# Altium PCB ArmBand-Control-Board.PcbDoc (part 3 of 3)
Units mil, origin at the board's own origin, x right, y up, seen from the top; angles counter-clockwise.
Board outline 1771.65 x 1771.65 mil, 2 copper layers (Top Layer, Bottom Layer), stack 34 mil thick; 107 components, 81 nets, 408 pads, 170 vias.
Unrouted connection lines stored in the file: 5.
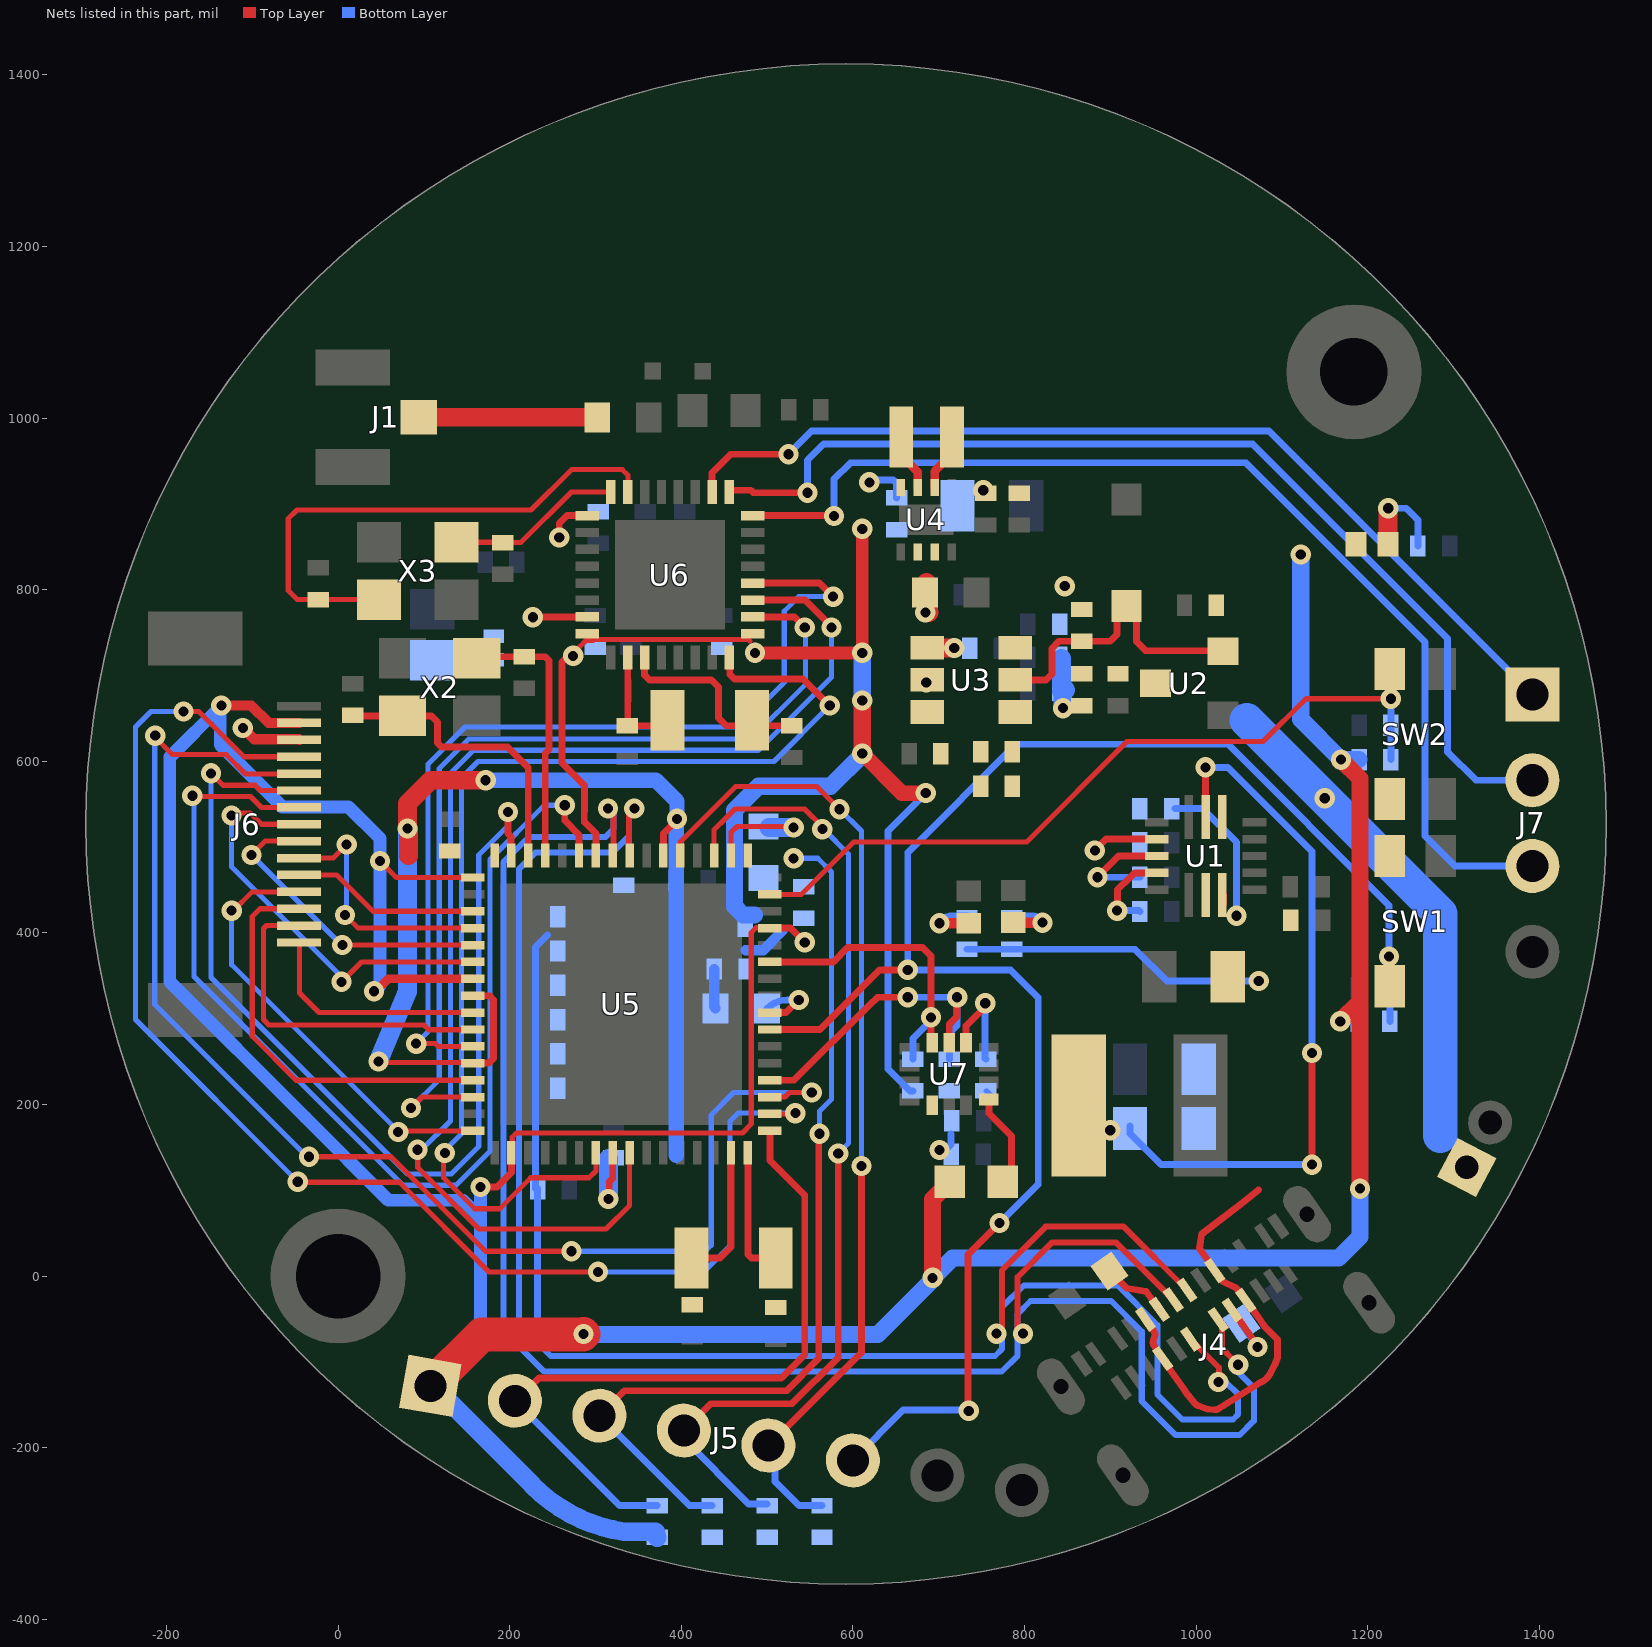
[diagram p2: the nets of this part, all layers, seen from the top]

## Via types
v1: diameter 23.62, hole 11.81, Top Layer to Bottom Layer, tented both sides, 169 vias
v2: diameter 17.72, hole 11.81, Top Layer to Bottom Layer, tented both sides, 1 vias

## Nets (pads, with @x,y where several pads share a name; then routed paths per layer and width w, separated by ;. In a path a pad name is that pad's centre, name@x,y a point inside that pad or via, vN(x,y) a via of type N, cw(c..) or ccw(c..) an arc to the next point about the centre after c; other vN are vias at no path point) (continued)
NetC16_2: C16.2 U1.14 | length 128.7
  Top Layer w8: v1(885,465) 909.69,489.68 U1.14@954,489.68
  Bottom Layer w8: v1(885,465) C16.2@934.5,465
NetC22_2: C22.2 U1.15 | length 105.1
  Top Layer w8: v1(908,426) 908.6,426.6 908.6,450.38 922.3,464.08 928.22,470 U1.15@954,470
  Bottom Layer w8: v1(908,426) 933.5,426 C22.2@934.5,425
NetC44_1: C44.1 R27.2 U3.6
NetJ1_1: J1.1 SB3.2 | length 208
  Top Layer w22: J1.1@94,1001 SB3.2@302,1001
NetJ4_A5: J4.A5 R20.2 | length 77.4
  Top Layer w8: R20.2@899,6 919,-14 942,-18 J4.A5@957.23,-38.75
NetJ4_B5: J4.B5 R21.2 | length 81.2
  Top Layer w8: J4.B5@1043.9,-41.54 1050.07,-50.36 1067.23,-74.86 v1@1070.9,-81.13
  Bottom Layer w8: R21.2@1053,-55 v1(1071.56,-82.56)
NetL1_1: L1.1 U4.7 | length 88
  Top Layer w10: L1.1@654,998 657.58,994.42 657.58,955.42 675.69,937.32 U4.7@675.69,919
NetL3_1: L3.1 L4.1
NetL4_2: L4.2 U6.31 | length 63.3
  Top Layer w8: v1@227,768.33 U6.31@290.33,768.33
  other v1: 227,768
NetL6_2: L6.2 U7.8 | length 111.3
  Top Layer w8: U7.8@758.52,206 758.52,189.5 763.21,184.81 763.45,184.81 785,163.26 785,120.09 L6.2@774.91,110
NetLED1_2: LED1.2 R28.2 | length 112.9
  Top Layer w22: LED1.2@1223.7,853 1223.7,895 v1(1224,895)
  Bottom Layer w8: v1(1224,895) 1245,895 1258.5,881.5 R28.2@1258.5,851
NetLED2_1: LED2.1 R2.1 | length 67.8
  Top Layer w12: v1(701,411.3) LED2.1@735,411.3
  Bottom Layer w12: v1(701,411.3) cw(c717.18,395.12) 717.18,418 R2.1@733,418
NetLED3_1: LED3.1 R3.1 | length 71.6
  Top Layer w12: LED3.1@787,412 v1(821,412)
  Bottom Layer w12: R3.1@785,418 806.51,418 cw(c806.51,397.51) v1(821,412)
NetR5_2: R5.2 SB1.2 | length 46.4
  Bottom Layer w12: R5.2@438.5,358 438.5,315.62 ccw(c443.62,315.62) SB1.2@440,312
NetR6_2: R6.2 SB2.2
NetR9_1: R9.1 U3.1 | length 31
  Top Layer w22: U3.1@687.22,732 v1(718.19,732)
NetR12_2: R12.2 U7.12 | length 120.7
  Top Layer w8: U7.12@731.94,271.94 731.94,291.85 754.31,314.21 v1(754.31,318.01)
  Bottom Layer w8: v1(754.31,318.01) 754.19,317.89 754.19,253.81 R12.2@755,253
NetR26_1: R26.1 U4.8 | length 51.5
  Bottom Layer w8: v1(619.2,925.19) 621.88,927.87 647.13,927.87 651,924 R26.1@651,907
NetSB1_1: SB1.1 U5.40 | length 78.2
  Top Layer w8: U5.40@504.61,307.15 522.15,307.15 v1(537,322)
  Bottom Layer w8: SB1.1@500,312 cw(c524.14,287.86) 524.14,322 v1(537,322)
NetSB2_1: SB2.1 U5.50 | length 132.5
  Top Layer w6: U5.50@457.95,490.23 457.95,517.31 464.83,524.19 529.58,524.19 v1(530.96,522.81)
  Bottom Layer w22: SB2.1@502.12,523.12 530.65,523.12 v1(530.96,522.81)
NRST: C24.1 J5.6 R8.1 SW1.1 U5.39 | length 1993.9
  Top Layer w8: U5.39@503.23,287.47 561.47,287.47 631,357 v1(664,357) ; v1(735,-157) 734.09,-156.09 734.09,25.09 v1(771,62)
  Bottom Layer w8: J5.6@599.96,-214.73 658.65,-156.04 734.04,-156.04 v1(735,-157) ; v1(771,62) 816,107 816,325 784,357 v1(664,357) 664,494 790,620 1037,620 1224.89,432.11 v1(1224.89,372.57) ; R8.1@1226,297 C24.1@1226,336 v1@1226,372.57
NTC: R18.1 R19.1 U1.13 | length 77.7
  Top Layer w8: v1(882,496) 882,496.24 895.13,509.37 U1.13@954,509.37
PWR_RST: D1.2 R4.2 R22.1 U2.2 U3.5 | length 348
  Top Layer w8: U3.5@789.18,695 825,695 832,702 832,731.61 840.39,740 900.05,740 907.96,747.91 907.96,770.36 D1.2@918.88,781.28 930.37,769.79 930.37,739.59 940.96,729 1030.77,729 U2.2@1031.37,728.4
RS1: L8.2 R1.2 U1.10 | length 858.3
  Top Layer w8: L8.2@866.13,172 898,172 v1(900,170) ; v1(1011,593) 1011.09,592.91 U1.10@1011.09,534.96 ; v1(1135,130) v1(1135,260)
  Bottom Layer w8: R1.2@923,175 923,166 959,130 v1(1135,130) ; v1(1011,593) 1037,593 1135,495 v1(1135,260)
RST_NRF: J7.3 U6.16 | length 1287
  Top Layer w8: U6.16@483.25,886.44 577.56,886.44 v1(578,886)
  Bottom Layer w8: v1(578,886) 578,929 597,948 1058.3,948 1267,739.3 1267,513 1302,478 J7.3@1392,478
RXD0: J6.11 U5.35 | length 1602.4
  Top Layer w6: v1(-213,630) -213,628 -192.81,607.81 -130.4,607.81 -107.76,585.17 -89.64,585.17 -45.56,585.17 J6.11@-45,585.73 ; v1(-34,139.14) 61.86,139.14 172,29 v1(272,29) ; U5.35@503.23,208.73 520.89,208.73 526.16,214.01 v1(552.01,214.01)
  Bottom Layer w6: v1(-213,630) -213.62,629.38 -213.62,316.62 v1@-35.07,138.07 ; v1(272,29) 428,29 435,36 435,188 461.01,214.01 v1(552.01,214.01)
SCL: R10.1 U5.36 U7.13 | length 386.7
  Top Layer w8: U5.36@504.61,228.42 531.68,228.42 619.46,316.2 619.66,316 628.68,325.01 v1@663.81,325.01 ; U7.13@712.26,271.94 712.26,293.38 714.06,295.17 721.51,302.62 v1@721.51,322.01
  Bottom Layer w8: v1@663.81,325.01 v1(721.51,325.01) 721.51,292.2 712.63,283.33 712.63,253.13 R10.1@712.5,253
  other v1: 664,325.01
SDA: R11.1 U5.43 U7.14 | length 357.9
  Top Layer w8: U5.43@503.23,366.21 577.21,366.21 594,383 681,383 691.01,372.99 v1(691.01,301.67) 691.01,273.51 U7.14@692.57,271.94
  Bottom Layer w8: R11.1@670,253 670,277.16 691.01,298.17 v1(691.01,301.67)
SENSOR1: J6.1 U5.9 | length 268.7
  Top Layer w6: J6.1@-45,388.88 -45,330 -22.16,307.16 U5.9@155.39,307.16
SENSOR2: J6.2 U5.10 | length 397.9
  Top Layer w6: J6.2@-45,408.57 -83.49,408.57 -87,405.06 -87,299 -80.81,292.81 100.03,292.81 105.68,287.17 U5.10@156.47,287.17
SENSOR3: J6.3 U5.13 | length 476.3
  Top Layer w6: J6.3@-45,428.25 -90.88,428.25 -100,419.12 -100,279.5 -48.92,228.42 82.42,228.42 U5.13@156.77,228.42
SENSOR4: J6.4 U5.16 | length 514.6
  Top Layer w6: v1(-124,426) -123,425 -100.06,447.94 J6.4@-45,447.94 ; v1(70,168) 71.36,169.36 U5.16@156.77,169.36
  Bottom Layer w6: v1(-124,426) -124,363 69,170 70,169 v1(70,168)
SENSOR5: J6.5 U5.3 | length 219.3
  Top Layer w6: J6.5@-45,467.62 -1.62,467.62 40.73,425.27 U5.3@156.77,425.27
SENSOR6: J6.6 U5.4 | length 299.5
  Top Layer w6: J6.6@-45,487.31 -5.69,487.31 v1(10,503) ; v1(8,421) 23.42,405.58 U5.4@156.77,405.58
  Bottom Layer w6: v1(8,421) 10,423 v1(10,503)
SENSOR7: J6.7 U5.5 | length 363.9
  Top Layer w6: v1(-101,491) -85,507 J6.7@-45,507 ; v1(5,386) 5.1,385.9 U5.5@156.77,385.9
  Bottom Layer w6: v1(-101,491) 4,386 v1(5,386)
SENSOR8: J6.8 U5.6 | length 495.3
  Top Layer w6: v1(-124.17,537) -121.34,539.83 -102.44,539.83 -89.3,526.68 J6.8@-45,526.68 ; v1(4,343) 27.21,366.21 78.79,366.21 U5.6@156.77,366.21
  Bottom Layer w6: v1(-124.17,537) -124.17,477.17 4,349 v1(4,343)
SW1: J6.9 U5.59 | length 1323.8
  Top Layer w6: v1(-169.81,560) -169.81,559.17 -101.94,559.17 -89.14,546.37 J6.9@-45,546.37
  Top Layer w8: v1(264.23,548.8) 264.23,530.86 280.79,514.3 U5.59@280.79,490.23
  Bottom Layer w6: v1(-169.81,560) -168.79,558.98 -167.79,558.98 -167.79,349.41 75.62,106 137.38,106 177,145.62 177,485.62 240.19,548.8 v1(264.23,548.8)
SW2: J6.10 U5.63 | length 1225.9
  Top Layer w6: v1(-148,586) -134.17,572.17 -96.55,572.17 -90.43,566.05 J6.10@-45,566.05
  Top Layer w8: v1(198,541) 198,516 201.57,512.43 201.57,490.7 U5.63@202.05,490.23
  Bottom Layer w6: v1(-148,586) -148,348 81,119 132,119 164,151 164,491 198,525 v1(198,541)
SWDCLK: J7.2 U6.17 | length 1224.2
  Top Layer w8: U6.17@455.69,914 455.69,914.49 457.2,916 481,916 484,913 v1(547,913)
  Bottom Layer w8: v1(547,913) 547,951 566,970 1066,970 1293,743 1293,611 1326,578 J7.2@1392,578
SWDIO: J7.1 U6.18 | length 1125.6
  Top Layer w8: U6.18@436,914 436,936.19 457.81,958 v1(525,958)
  Bottom Layer w8: v1(525,958) 552,985 1085,985 J7.1@1392,678
TCK: J5.5 R16.1 U5.53 | length 1138.3
  Top Layer w6: U5.53@398.85,499.04 399.33,499.52 399.33,506.48 406.66,513.81 463.47,570.62 558.02,570.62 v1(584.48,544.16)
  Top Layer w8: J5.5@501.48,-197.36 609.96,-88.88 v1(609.96,128.48)
  Bottom Layer w6: v1(584.48,544.16) 609.96,518.68 v1@609.96,129.04
  Bottom Layer w8: J5.5@501.48,-197.36 509.18,-205.06 509.18,-239.18 537.5,-267.5 R16.1@564,-267.5
TDI: J5.2 R13.1 U5.33 | length 854.4
  Top Layer w8: J5.2@206.04,-145.27 207.63,-145.27 234.28,-118.62 516.58,-118.62 544,-91.21 544,94 503.23,134.77 U5.33@503.23,169.36
  Bottom Layer w8: J5.2@206.04,-145.27 328.27,-267.5 R13.1@372,-267.5
TDO: J5.3 R14.1 U5.49 | length 1080.2
  Top Layer w8: J5.3@304.52,-162.64 333.53,-133.62 522.8,-133.62 560.19,-96.23 560.19,116.6 560.19,165.19 v1(561,166)
  Bottom Layer w6: v1@534.37,490.37 537.74,487 559.14,487 575,471.14 575,435.86 575,337.86 575,206.16 561,192.16 v1(561,166)
  Bottom Layer w8: J5.3@304.52,-162.64 409.38,-267.5 R14.1@436,-267.5
  other v1: 531,487
TMS: J5.4 R15.1 U5.51 | length 1165.3
  Top Layer w6: U5.51@438.27,490.23 438.27,520.27 452,534 462.62,544.62 543.57,544.62 564.45,523.75 v1(564.45,521.01)
  Top Layer w8: J5.4@403,-180 434.38,-148.62 529.01,-148.62 583,-94.63 v1(583,143)
  Bottom Layer w6: v1(564.45,521.01) 565.65,521.01 595,491.66 595,155 v1(583,143)
  Bottom Layer w8: J5.4@403,-180 403,-190 478.5,-265.5 R15.1@500,-265.5
TXD0: J6.12 U5.34 | length 1643.8
  Top Layer w6: v1(-180.1,658.1) -162.31,658.1 -132.99,628.79 -109.62,605.42 J6.12@-45,605.42 ; v1(-47,110) -46.5,109.5 71.5,109.5 176,5 v1(303,5) ; U5.34@503.23,189.05 532.05,189.05 v1(533,190)
  Bottom Layer w6: v1(-180.1,658.1) -217.9,658.1 -236,640 -236,299 v1(-47,110) ; v1(303,5) 426,5 457,36 457,181 466,190 v1(533,190)
UART_CTS: U5.25 U6.11 | length 1481.9
  Top Layer w6: v1(92.54,147.27) 92.85,146.97 92.85,126.54 164.38,55 312.44,55 339.84,82.4 U5.25@339.84,143.77
  Top Layer w8: U6.11@483.25,788.01 544.25,788.01 575,757.26 v1(575,756)
  Bottom Layer w6: v1(92.54,147.27) 97.27,147.27 131,181 131,586.23 157.77,613 490,613 575,698 v1(575,756)
UART_RTS: U5.23 U6.8 | length 1322.1
  Top Layer w6: v1(124.42,143.58) 123,142.15 123,114.77 159.23,78.54 188.54,78.54 224.62,114.62 292.62,114.62 300.47,122.47 U5.23@300.47,143.77
  Top Layer w8: U6.8@455.69,721.08 456.44,720.33 456.44,701.56 462,696 542,696 v1(573,665)
  Bottom Layer w6: v1(124.42,143.58) 124.42,146.42 144,166 144,580.85 163.15,600 508,600 v1(573,665)
UART_RXD: U5.11 U6.12 | length 1099.2
  Top Layer w6: v1(91,271) 113.49,271 116.7,267.79 U5.11@155.39,267.79
  Top Layer w8: U6.12@483.25,807.7 561.3,807.7 v1(577,792)
  Bottom Layer w6: v1(91,271) 105,285 105,597 148,640 468,640 520,692 520,775 537,792 v1(577,792)
UART_TXD: U5.14 U6.10 | length 1085.3
  Top Layer w6: v1(85,196) 97.73,208.73 U5.14@156.77,208.73
  Top Layer w8: U6.10@484.29,768.33 484.45,768.16 531.84,768.16 v1(544,756)
  Bottom Layer w6: v1(85,196) 118,229 118,591.61 152.39,626 481,626 545,690 545,755 v1(544,756)
USB_D_N: J4.A7 J4.B7 U5.56 | length 2265.8
  Top Layer w7: U5.56@339.84,490.23 339.15,490.92 339.15,538.84 v1(345.31,545) ; v1(767.54,-67) 773.7,-60.84 773.7,6.58 824.78,57.66 915.66,57.66 J4.A7@989.48,-16.17 ; J4.B7@993.52,-73.41 1026.73,-106.62 1026.73,-112.54 1030.7,-116.52 1030.7,-119.3 1026.57,-123.43 v1(1025.96,-123.43)
  Bottom Layer w7: v1(345.31,545) 339.15,538.84 339.15,513.42 319.43,493.7 230.06,493.7 211,474.64 211,124 211,-56 248,-93 401.73,-93 765.7,-93 773.7,-85 773.7,-73.16 v1(767.54,-67) 773.7,-60.84 773.7,-36.42 799.42,-10.7 908.58,-10.7 955,-57.12 955,-138 984,-167 1043,-167 1049,-161 1049,-137.81 1034.62,-123.43 v1(1025.96,-123.43)
USB_D_P: J4.A6 J4.B6 U5.57 | length 2292.3
  Top Layer w7: v1(314.69,545) 320.85,538.84 320.85,490.92 U5.57@320.16,490.23 ; v1(798.16,-67) 792,-60.84 792,-1 832.36,39.36 906.54,39.36 J4.A6@973.36,-27.46 ; J4.B6@1025.77,-50.83 1030.49,-55.55 1030.49,-84.51 1043.64,-97.65 1052.35,-97.65 1052.35,-99.99 v1(1049.04,-103.3)
  Bottom Layer w7: v1(314.69,545) 320.85,538.84 320.85,521 311.85,512 222.48,512 192.7,482.22 192.7,116.42 192.7,-63.58 240.42,-111.3 377.56,-111.3 773.28,-111.3 792,-92.58 792,-73.16 v1(798.16,-67) 792,-60.84 792,-44 807,-29 901,-29 936.7,-64.7 936.7,-145.58 976.42,-185.3 1050.58,-185.3 1067.3,-168.58 1067.3,-130.23 1049.04,-111.97 v1(1049.04,-103.3)
VBAT: C2.1 C3.1 C4.1 C43.1 C44.2 J3.1 J6.13 R1.1 R22.2 R24.2 R27.1 U1.9 U3.4 | length 712.5
  Top Layer w12: v1(-111,639) -97.79,625.79 -45.69,625.79 J6.13@-45,625.1
  Top Layer w22: U3.4@789.18,657.6 U3.4@791.96,654.82
  Bottom Layer w22: C43.1@843,681.5 844.69,679.81 844.69,662.31 v1(845,662) ; C4.1@843,720 843,688.31 C43.1@848,683.31
  Bottom Layer w40: 1059,648 v1(1150,557) 1284.62,422.38 1284.62,163.73
  other v1: 846.94,804.23
VBAT#: C5.1 C6.1 C51.1 U3.2 U3.3 U4.2 U4.3 | length 37.4
  Top Layer w22: C5.1@685,792 C5.1@686,792 ; C5.1@686,808.5 C5.1@686,792 ; v1@688.52,773.44 688.21,773.75 688.21,790.29 686.5,792 C5.1@686,792
  other v1: 685.5,692 684.52,773.44
VBAT##: R24.1 R25.1 U2.3
VCC: C45.1 R18.2 U1.3 | length 183.9
  Top Layer w10: U1.3@1030.77,434 U1.3@1030.77,444.41
  Bottom Layer w8: R18.2@975.5,545 1007.79,545 1047,505.79 v1(1047,420)
VCC_3V3: C7.1 C9.1 C10.1 C11.1 C12.1 C13.1 C14.1 C31.1 C33.1 C34.1 C41.1 C42.1 C46.1 C47.1 J5.1 J6.14 L1.2 L6.1 LED1.1 R5.1 R6.1 R7.2 R8.2 R10.2 R11.2 R12.1 R13.2 R14.2 R15.2 R16.2 R26.2 U4.6 U5.1 U5.7 U5.18 U5.45 U5.58 U6.9 U6.25 U6.32 U7.5 | length 7450.9
  Top Layer w6: v1(48.74,483.81) 67.91,464.64 U5.1@156.77,464.64 ; U5.18@202.05,143.77 203,144.72 203,162 207.9,166.9 471.3,166.9 481.6,177.2 481.6,400.6 487,406 503.37,406 U5.45@503.51,405.86 ; 281,733 288.86,740.86 297.11,740.86 298.11,741.86 464.1,741.86 ; U6.32@290.33,748.64 297.11,741.86 ; 464.51,741.86 478.57,741.86 ; U6.9@473.95,746.49 478.57,741.86 ; 478.99,741.86 478.57,741.86 ; 479.98,740.45 478.57,741.86
  Top Layer w8: v1(166.12,103.88) 185.14,103.88 202.05,120.8 U5.18@202.05,143.77 ; v1(257.74,860.98) 257.74,877.18 267,886.44 U6.25@290.33,886.44 ; v1(274,723) 268,723 261,716 261,598 287.04,571.96 287.04,549.56 287.04,541.74 286.97,541.67 286.97,529.33 300.47,515.82 U5.58@300.47,490.23 ; U5.45@503.51,405.86 527.14,405.86 v1(544,389.02)
  Top Layer w10: v1(42,332) 44,332 58.53,346.53 U5.7@156.77,346.53 ; U4.6@695.37,919 695.37,938.37 712.42,955.42 712.42,998.37 L1.2@713,998.94
  Top Layer w12: v1(-136,665) -101,665 -80.79,644.79 J6.14@-45,644.79
  Top Layer w15: v1(485.98,726.45) v1(611,726.45) v1(611,871)
  Top Layer w18: v1(611,609) 657,563 v1(685,563)
  Top Layer w20: v1(611,609) v1(611,671) ; v1(693,-2) 693,89.91 L6.1@713.09,110 ; v1(1168,297) 1191,320 ; v1(1169,602) 1191,580 1191,320 ; v1(1191,102) 1191,320
  Top Layer w40: J5.1@107.56,-127.91 167.46,-68 285.39,-68 v1(286,-67.39)
  Bottom Layer w6: R12.1@755,216 756,216 R12.1@764,208
  Bottom Layer w8: C11.1@230,102 230,383.5 244,397.5 ; C11.1@232.5,102 232.5,-55.5 245,-68 v1@286,-68 ; v1(257.74,860.98) 259,860.98 259,860 v1@263,856 ; R11.2@670,216 666.5,216 641,241.5 641,519 v1(685,563) ; C42.1@708,147 714.5,153.5 714.5,165.5 ; v1(1168,297) R8.2@1189,297
  Bottom Layer w12: 475.01,380 495.5,380 518,402.5
  Bottom Layer w15: v1(42,332) 48.74,338.74 v1(48.74,483.81) 48.74,510.26 12,547 -65,547 -137.31,619.31 -137.31,663.69 v1(-136,665) -196.12,604.88 -196.12,571.9 -196.12,343.12 -37.93,184.93 58.5,88.5 145.5,88.5 166.12,67.89 ; J5.1@107.56,-127.91 166.12,-69.35 166.12,67.89 ; v1(166.12,103.88) 166.12,67.89
  Bottom Layer w20: v1(286,-67.39) 286,-68 629,-68 693,-4 v1(693,-2) 716,21 1166,21 1191,46 v1(1191,102) ; 485,421 472,421 462,431 462,543 490,571 574,571 v1@612,609 ; v1(611,671) v1(611,726.45) ; v1(1122,841) 1122,649 v1(1169,602) R7.2@1190,602
  Bottom Layer w22: J5.1@107.56,-127.91 110.67,-127.91 226.72,-243.95 ccw(c361.3,-110.16) 333.6,-297.9 367.4,-297.9 370,-297.9 371.24,-303.08 R13.2@372,-304.5
  other v1: 701,147 752,916
VDD_1V2: C15.1 C17.1 C18.1 C19.1 C20.1 C21.1 U5.8 U5.12 U5.24 U5.54 U5.64 | length 1461.9
  Top Layer w6: v1(47,250.23) 48.06,249.17 155.71,249.17 U5.12@156.77,248.1
  Top Layer w8: U5.12@156.77,248.1 157.11,248.45 176.1,248.45 181.25,253.6 181.25,322.16 176.57,326.84 U5.8@166.81,326.84 ; v1(315,90) 316,91 316,110 320.16,114.16 U5.24@320.16,143.77 ; U5.54@379.21,490.23 379.21,516.01 395,531.8 v1(395,533)
  Top Layer w22: v1(81,521.69) 81,551 108,578 v1(172,578) ; 82,490 v1@82,521.69
  Bottom Layer w18: v1(172,578) 370.48,578 395,553.48 v1(395,533) 394.31,532.31 C21.1@394.31,460.69 394.31,141
  Bottom Layer w22: v1(47,250.23) 80.78,331.23 80.78,512.5 v1@80.78,521.69 ; v1(315,90) C20.1@315,137
VUSB: C1.1 J4.A4 J4.A9 J4.B4 J4.B9 R2.2 R3.2 U1.2 | length 859.7
  Top Layer w8: J4.A4@941.11,-50.04 947.29,-58.85 950.58,-63.55 cw(c944.03,-68.14) 951.52,-70.95 950.38,-74 ccw(c957.87,-76.8) 951.31,-81.39 955.28,-87.05 J4.B9@961.27,-96 967.05,-105.09 987.85,-134.79 ; 987.88,-134.83 ccw(c994.41,-130.2) 988.19,-135.23 998.65,-148.31 ; 998.66,-148.33 ccw(c1004.89,-143.31) 1002,-150.77 1011.88,-154.57 1014.15,-155.11 1021.31,-155.76 ; 1021.34,-155.76 ccw(c1022.03,-147.79) 1026.29,-154.56 1074.75,-124.16 cw(c1079,-130.93) 1075.6,-123.69 1075.68,-123.65 ccw(c1066,-103) 1078.99,-121.75 ccw(c1066,-103) 1086.1,-113.79 1092,-102.8 ccw(c1084.95,-99.02) 1092.44,-101.82 1094.49,-96.36 ccw(c1087,-93.55) 1095,-93.55 1095,-87.8 1095,-73.74 1081.01,-59.75 cw(c1085.73,-53.29) 1079.05,-57.69 1079.02,-57.65 1076,-53 1064.63,-36.76 J4.B4@1058.02,-28.25 1051.2,-19.89 1047.92,-15.21 1046.51,-13.8 1045.77,-13.35 1031.07,-6.25 1028.22,-2.18 J4.A9@1021.73,6.42 1015.81,15.41 1003.96,32.34 1006.59,49.17 1052,83.66 1072.85,100.66
  Bottom Layer w8: R2.2@733,381 R3.2@785,381 929,381 966,344 v1(1073,344)
WKUP: C23.1 R7.1 SW2.1 U5.47 | length 924.2
  Top Layer w6: U5.47@503.23,444.95 539.95,444.95 601,506 745.85,506 802.59,506 919.59,623 1010.15,623 1078,623 1128,673 v1(1227,673) 1225.94,674.06 SW2.1@1225.94,707.57
  Bottom Layer w8: R7.1@1227,602 C23.1@1227,642 v1(1227,673)
X32_NRF: C8.2 U6.2 X4.1 | length 120.3
  Top Layer w8: C8.2@337,641.5 C8.2@337.58,641.5 ; U6.2@337.58,721.08 337.58,694.68 337.81,694.45 337.81,670.59 337.58,670.36 C8.2@337.58,641.5 ; X4.1@377.5,641.5 C8.2@337.58,641.5
XC_IN: C39.2 U6.23 X3.1 | length 635.7
  Top Layer w6: X3.1@47.72,788.54 C39.2@-23,788.54 -47.54,788.54 -58,799 -58,883 -48,893 225,893 272,940 331.2,940 337.8,933.4 U6.23@337.8,914.22
  Top Layer w8: U6.23@337.58,914 U6.23@337.8,914.22
XC_OUT: C40.2 U6.24 X3.3 | length 204.1
  Top Layer w6: X3.3@138.28,855.46 C40.2@192,855.46 ; C40.2@192,855 213,855 272,914 U6.24@317.89,914
XIN: C27.2 U5.62 X2.1 | length 351.6
  Top Layer w8: C27.2@12,653 75,653 109,653 116,646 116,621.24 120.69,616.56 197.7,616.56 221.73,592.52 U5.62@221.73,490.23
XIN32: C25.2 U5.32 X1.1 | length 155
  Top Layer w8: U5.32@477.64,143.77 477.64,25.36 482,21 X1.1@510.21,21 X1.1@508.64,22.57
XO32_NRF: C50.2 U6.3 X4.2 | length 233.9
  Top Layer w8: U6.3@357.26,721.08 357.26,700.82 363.08,695 435,695 443.41,686.59 443.41,650.59 452.5,641.5 475.93,641.5 X4.2@482.43,648 ; X4.2@488.93,641.5 C50.2@529,641.5
XOUT: C28.2 U5.61 X2.3 | length 320.7
  Top Layer w8: X2.3@159.87,721.74 160.13,722 C28.2@224.5,722 ; C28.2@221,722 241.31,722 246,717.31 246,614 241.42,609.42 U5.61@241.42,490.23
XOUT32: C26.2 U5.31 X1.2 | length 161.3
  Top Layer w8: X1.2@411.79,21 445,21 457.95,33.95 U5.31@457.95,143.77
pads on no net: J4.A2 J4.A3 J4.A8 J4.A10 J4.A11 J4.B2 J4.B3 J4.B8 J4.B10 J4.B11 U1.4 U1.5 U1.7 U5.15 U5.19 U5.20 U5.21 U5.22 U5.26 U5.27 U5.28 U5.37 U5.38 U5.41 U5.42 U5.44 U5.52 U6.4 U6.5 U6.6 U6.7 U6.13 U6.14 U6.15 U6.26 U6.27 U6.28 U7.1 U7.10 U7.11

## Polygon pours and split planes (outlines as drawn)
GND on Top Layer "GND_L01_P005" (solid, remove dead copper, pour order 5): -293.83,527 ccw(c592,527) 592,-358.83 ccw(c592,527) 1477.83,527 ccw(c592,527) 592,1412.83 ccw(c592,527)
VUSB on Top Layer "VUSB_L01_P002" (solid, remove dead copper, pour order 2): 1052,83.66 1109,83.66 1109,388 1017,388 1017,470 1004,470 1004,309 1052,309
ANT# on Top Layer "ANT#_L01_P006" (solid, remove dead copper, pour order 6): 434.86,1063.4 434.86,990 383,990 383,981 345,981 345,1023 388,1023 388,1038 415.17,1038 415.17,1063.4
GND on Bottom Layer "GND_L02_P004" (solid, remove dead copper, pour order 4): -293.83,527 ccw(c592,527) 592,-358.83 ccw(c592,527) 1477.83,527 ccw(c592,527) 592,1412.83 ccw(c592,527)
VBAT on Bottom Layer "VBAT_L02_P003" (solid, remove dead copper, pour order 3): 1237.5,143 1335.36,89.94 1363,136 1087.07,273 982,273 982,143

## Other copper
Top Layer:
  rectangle net VBAT: 835.89,768 880,815.73
  rectangle net VCC_3V3: 1101,824.18 1141.39,883.92
  rectangle net VCC_3V3: 737,940 1038,1016
  rectangle net VDD_1V2: 71,477 185,504
  rectangle net GND: 128,628 234,680
  rectangle net VCC_3V3: 948,841 1038,1016
  rectangle net VCC_3V3: 948,838.17 1198.57,884
  region net XIN32: 523,-46 523,39 495,39 495,-46
  rectangle net RS1: 827,115 912,285
  rectangle net VCC_3V3: 686,90 732,148
  region net XOUT32: 426,-43 426,42 398,42 398,-43
  region net XIN32: 531,57 490,57 490,-14 531,-14
  rectangle net GND: 710,188 734.83,210
  rectangle net VCC_3V3: 689,138 727,162
  rectangle net GND: 654,228 678,247.68
  rectangle net NRST: 1208,312 1245,514
  rectangle net WKUP: 1208,531 1245,732
  region net GND: 655,899 630,899 630,628 655,628
  rectangle net GND: 177,820 205,833
  rectangle net GND: 652,827 662,865
  rectangle net GND: 0,689 112,745
  rectangle net GND: 111,764 205,822
  rectangle net GND: -36,822 76,879
  rectangle net GND: 983,638 1052,703
  rectangle net GND: 894,644 924,675
  rectangle net VBAT##: 931,669 973,691
  rectangle net VBAT#: 663,638 704,710
  rectangle net VBAT#: 685,592 724,710
  rectangle net VCC_3V3: 686,147 698,210
  region net GND: 1180,-109 1248.25,-61.21 1133.77,102.27 1065.53,54.48
  region net GND: 981.15,-248.4 1240.95,-66.49 1220.8,-37.71 961,-219.63
  region net GND: 928.42,-285.71 996.66,-237.93 882.19,-74.44 813.94,-122.23
  rectangle net VBAT: 766,548 812,673
  rectangle net VBAT: 766,649 884,674
  rectangle net \C\H\G\O\K\: 982,509 998,562
  rectangle net GND: 894,642 1052,661
  rectangle net GND: 951,740 995,795
  rectangle net ERASE: 353,475 367,504.69
  rectangle net VCC_3V3: 257,712 305,754
  rectangle net VCC_3V3: 700,939 755,1016
  rectangle net VCC: 1026,399 1124,434
  rectangle net VBAT: 1026,544 1162,575
  rectangle net NetC44_1: 737,718 810,748
  rectangle net NetC44_1: 737,557 759,748
  rectangle net VBAT##: 854,683 973,717
  rectangle net VCC_3V3: 470,711 500,754
  rectangle net SWDCLK: 449,900 560,928
  rectangle net VCC_3V3: 737,903 845,1016
  rectangle net NetR26_1: 612,920 661,935
  rectangle net VBAT#: 669,761 700,854
  rectangle net GND: 711,863 730,930
  rectangle net GND: 654,863 845,895
  rectangle net GND: -1,678 32,703
  rectangle net GND: 204,628 231,697
  rectangle net PWR_RST: 1008,711 1050,796
  rectangle net TDO: 474,479 538,504
  pour cut-out: 831,101 1035,101 1035,304 831,304
  pour cut-out: -127,1059 -127,1382 1315,1382 1315,1059
Bottom Layer:
  rectangle net NetL3_1: 83.92,694.64 193.56,726.56
  rectangle net NetL4_2: 169.93,737.57 193.47,782.8
  rectangle net NetL4_2: 169.93,753.14 240.38,782.8
  rectangle net VBAT: -117,627 -10,654
  rectangle net AVDD: 77,796 183,850
  rectangle net VBAT: -83,627 -10,1005
  rectangle net VBAT: -83,990 495,1012
  rectangle net VBAT: 473,824 495,1004
  rectangle net VBAT: 473,824 864,849
  rectangle net VBAT: 831,631 1072,668
  rectangle net RS1: 885,145 943,204
  rectangle net VCC_3V3: 656,205 767,234
  rectangle net VCC_3V3: 690,124 728,207
  rectangle net VDD_1V2: 241,130 270,311
  rectangle net GND: 198,817 226,941
  rectangle net NetR6_2: 480,440 565,467
  rectangle net GND: 286,753 461,865
  rectangle net VCC_3V3: 697,868 770,936
  rectangle net GND: 280,161 353,432
  rectangle net VDD_1V2: 241,130 406,153
  rectangle net VCC_3V3: 597,859 770,884
  rectangle net RS1: 903,146 943,204
  rectangle net VBAT#: 672,641 698,808
  rectangle net GND: 949,679 1019,768
  rectangle net VCC_3V3: 250,708 279,903
  rectangle net NetR6_2: 479,440 512,491
  rectangle net VBAT: 831,631 864,849
  rectangle net GND: 718,763 814,807
  rectangle net GND: 761,666 817,807
  rectangle net VCC_3V3: 359,-316 578,-285
  rectangle net VCC_3V3: 462,341 564,431
  rectangle net VCC_3V3: 261,881 318,903
  rectangle net BST: 959,390 984,438
  rectangle net NetR9_1: 705,715 748,754
  region net VCC_3V3: 499,744 431,744 431,708 499,708
  rectangle net AVDD: 77,751 140,850
  rectangle net VCC_3V3: 261,708 315,744
  rectangle net GND: 956,452 1007,519
  rectangle net NTC: 870,485 949,559
  rectangle net VCC_3V3: 238,440 353,469
  rectangle net VCC_3V3: 225,320 270,468
  pour cut-out: -127,1059 -127,1382 1315,1382 1315,1059

## Silkscreen, mask and mechanical layers (free items; w line width, h text height)
Top Overlay:
  circle w7.87: c113,1045 r3.16
  text "IND: LED" at 1010.66,830.62 h28
  text "SENSOR BOARD" at 74,376.86 h50 r90
  text "-VE" at 1285,169 h50 r62.5
  text "+VE" at 1246,94 h50 r62.5
Bottom Overlay:
  drawing of 2568 lines, arcs and shapes, not listed
  text "-VE" at 1415.67,279.43 h60 r62.5
  text "Control Board-v2.0" at -191.7,183.98 h40 r270
  text "+VE" at 1310.99,78.47 h60 r62.5
Board_outline:
  circle w10: c592,526 r885.83
Fabrication:
  drawing of 191 lines, arcs and shapes, not listed
  text "Layer" at 1736.2,2425 h60
  text "Name" at 2146.11,2425 h60
  text "Material" at 3075.85,2425 h60
  text "Thickness" at 3935.62,2425 h60
  text "Constant" at 4585.46,2425 h60
  text "Board Layer Stack" at 5155.32,2425 h60
  text "Top Overlay" at 2146.11,2305 h60
  text "Top Solder" at 2146.11,2185 h60
  text "Solder Resist" at 3075.85,2185 h60
  text "0.076mm" at 3935.62,2185 h60
  text "3.5" at 4585.46,2185 h60
  text "1" at 1736.2,2065 h60
  text "Top Layer" at 2146.11,2065 h60
  text "0.229mm" at 3935.62,2065 h60
  text "Dielectric 1" at 2146.11,1945 h60
  text "FR-4" at 3075.85,1945 h60
  text "0.406mm" at 3935.62,1945 h60
  text "4.6" at 4585.46,1945 h60
  text "2" at 1736.2,1825 h60
  text "Bottom Layer" at 2146.11,1825 h60
  text "0.229mm" at 3935.62,1825 h60
  text "Bottom Solder" at 2146.11,1705 h60
  text "Solder Resist" at 3075.85,1705 h60
  text "0.076mm" at 3935.62,1705 h60
  text "3.5" at 4585.46,1705 h60
  text "Bottom Overlay" at 2146.11,1585 h60
  text "Total board thickness:" at 1736.2,1465 h60
  text "1.016mm" at 3935.62,1465 h60
Drill Drawing:
  circle w10: c1788.62,838.28 r33.33
  lines w10: 1755.29,204.94 1788.62,221.61 1821.96,204.94 1805.29,238.28 1821.96,271.61 1788.62,254.94 1755.29,271.61 1771.96,238.28 1755.29,204.94 ; 1755.29,354.94 1821.96,354.94 1821.96,421.61 1755.29,421.61 1755.29,354.94 ; 1755.29,521.61 1771.96,521.61 1788.62,504.94 1805.29,521.61 1821.96,521.61 1805.29,538.28 1821.96,554.94 1805.29,554.94 1788.62,571.61 1771.96,554.94 1755.29,554.94 1771.96,538.28 1755.29,521.61 ; 1755.29,721.61 1821.96,721.61 1788.62,654.94 1755.29,721.61 ; 1755.29,971.61 1771.96,971.61 1771.96,954.94 1805.29,954.94 1805.29,971.61 1821.96,971.61 1821.96,1004.94 1805.29,1004.94 1805.29,1021.61 1771.96,1021.61 1771.96,1004.94 1755.29,1004.94 1755.29,971.61 ; 1755.29,1104.94 1755.29,1121.61 1771.96,1138.28 1755.29,1154.94 1755.29,1171.61 1771.96,1171.61 1788.62,1154.94 1805.29,1171.61 1821.96,1171.61 1821.96,1154.94 1805.29,1138.28 1821.96,1121.61 1821.96,1104.94 1805.29,1104.94 1788.62,1121.61 1771.96,1104.94 1755.29,1104.94
  lines w15: 1695.5,159.94 15123.72,159.94 ; 1695.5,1209.94 15123.72,1209.94 ; 2246.38,9.94 2246.38,1359.94 ; 2836.22,9.94 2836.22,1359.94 ; 3935.9,9.94 3935.9,1359.94 ; 4441.78,9.94 4441.78,1359.94 ; 5175.58,9.94 5175.58,1359.94 ; 6675.13,9.94 6675.13,1359.94 ; 7264.98,9.94 7264.98,1359.94 ; 8010.78,9.94 8010.78,1359.94 ; 9110.45,9.94 9110.45,1359.94 ; 9964.22,9.94 9964.22,1359.94 ; 11297.83,9.94 11297.83,1359.94 ; 12631.43,9.94 12631.43,1359.94 ; 13721.12,9.94 13721.12,1359.94 ; 1695.5,9.94 15123.72,9.94 15123.72,1359.94 1695.5,1359.94 1695.5,9.94
  text "Symbol" at 1785.5,1254.94 h72
  text "Count" at 2291.38,1254.94 h72
  text "Hole Size" at 2881.22,1254.94 h72
  text "Plated" at 3980.9,1254.94 h72
  text "Hole Type" at 4486.78,1254.94 h72
  text "Drill Layer Pair" at 5220.58,1254.94 h72
  text "Via/Pad" at 6720.13,1254.94 h72
  text "Pad Shape" at 7309.98,1254.94 h72
  text "Template" at 8055.78,1254.94 h72
  text "Description" at 9155.45,1254.94 h72
  text "Hole Tolerance (+)" at 10009.22,1254.94 h72
  text "Hole Tolerance (-)" at 11342.83,1254.94 h72
  text "Hole Length" at 12676.43,1254.94 h72
  text "Routed Path Length" at 13766.12,1254.94 h72
  text "1" at 2291.38,1104.94 h60
  text "78.74mil (2.000mm)" at 2881.22,1104.94 h60
  text "PTH" at 3980.9,1104.94 h60
  text "Round" at 4486.78,1104.94 h60
  text "Top Layer - Bottom Layer" at 5220.58,1104.94 h60
  text "Pad" at 6720.13,1104.94 h60
  text "Rounded" at 7309.98,1104.94 h60
  text "c400h200" at 8055.78,1104.94 h60
  text "-" at 12676.43,1104.94 h60
  text "-" at 13766.12,1104.94 h60
  text "1" at 2291.38,954.94 h60
  text "98.43mil (2.500mm)" at 2881.22,954.94 h60
  text "PTH" at 3980.9,954.94 h60
  text "Round" at 4486.78,954.94 h60
  text "Top Layer - Bottom Layer" at 5220.58,954.94 h60
  text "Pad" at 6720.13,954.94 h60
  text "Rounded" at 7309.98,954.94 h60
  text "c400h250" at 8055.78,954.94 h60
  text "-" at 12676.43,954.94 h60
  text "-" at 13766.12,954.94 h60
  text "2" at 2291.38,804.94 h60
  text "17.72mil (0.450mm)" at 2881.22,804.94 h60
  text "PTH" at 3980.9,804.94 h60
  text "Slot" at 4486.78,804.94 h60
  text "Top Layer - Bottom Layer" at 5220.58,804.94 h60
  text "Pad" at 6720.13,804.94 h60
  text "Rounded" at 7309.98,804.94 h60
  text "r85_185h45_145r42" at 8055.78,804.94 h60
  text "57.09mil (1.450mm)" at 12676.43,804.94 h60
  text "39.37mil (1.000mm)" at 13766.12,804.94 h60
  text "2" at 2291.38,654.94 h60
  text "17.72mil (0.450mm)" at 2881.22,654.94 h60
  text "PTH" at 3980.9,654.94 h60
  text "Slot" at 4486.78,654.94 h60
  text "Top Layer - Bottom Layer" at 5220.58,654.94 h60
  text "Pad" at 6720.13,654.94 h60
  text "Rounded" at 7309.98,654.94 h60
  text "r85_205h45_165r42" at 8055.78,654.94 h60
  text "64.96mil (1.650mm)" at 12676.43,654.94 h60
  text "47.25mil (1.200mm)" at 13766.12,654.94 h60
  text "2" at 2291.38,504.94 h60
  text "27.56mil (0.700mm)" at 2881.22,504.94 h60
  text "PTH" at 3980.9,504.94 h60
  text "Round" at 4486.78,504.94 h60
  text "Top Layer - Bottom Layer" at 5220.58,504.94 h60
  text "Pad" at 6720.13,504.94 h60
  text "(Mixed)" at 7309.98,504.94 h60
  text "(Mixed)" at 8055.78,504.94 h60
  text "-" at 12676.43,504.94 h60
  text "-" at 13766.12,504.94 h60
  text "12" at 2291.38,354.94 h60
  text "37.40mil (0.950mm)" at 2881.22,354.94 h60
  text "PTH" at 3980.9,354.94 h60
  text "Round" at 4486.78,354.94 h60
  text "Top Layer - Bottom Layer" at 5220.58,354.94 h60
  text "Pad" at 6720.13,354.94 h60
  text "(Mixed)" at 7309.98,354.94 h60
  text "(Mixed)" at 8055.78,354.94 h60
  text "-" at 12676.43,354.94 h60
  text "-" at 13766.12,354.94 h60
  text "170" at 2291.38,204.94 h60
  text "11.81mil (0.300mm)" at 2881.22,204.94 h60
  text "PTH" at 3980.9,204.94 h60
  text "Round" at 4486.78,204.94 h60
  text "Top Layer - Bottom Layer" at 5220.58,204.94 h60
  text "Via" at 6720.13,204.94 h60
  text "Rounded" at 7309.98,204.94 h60
  text "(Mixed)" at 8055.78,204.94 h60
  text "-" at 12676.43,204.94 h60
  text "-" at 13766.12,204.94 h60
  text "190 Total" at 2291.38,54.94 h60
  text "Slot definitions :" at 1785.5,-90.03 h60
  text "Routed Path Length" at 2818.19,-90.03 h60
  text "= Calculated from tool start centre position to tool end centre position." at 3920.86,-90.03 h60
  text "Hole Length" at 2818.19,-190.01 h60
  text "= Routed Path Length + Tool Size = Slot length as defined in the PCB layout" at 3510.99,-190.01 h60

## Dimensions
-293.83,526 to 1477.83,526 on Dimension